# Altium PCB K601-6252双模带屏 VER 1.1 2026 10 16.PcbDoc (part 10 of 12)
Units mm, origin at the board's own origin, x right, y up, seen from the top; angles counter-clockwise.
Board outline 75.02 x 25.73 mm, 2 copper layers (Top Layer, Bottom Layer); 43 components, 67 nets, 219 pads, 157 vias.
Unrouted connection lines stored in the file: 1.
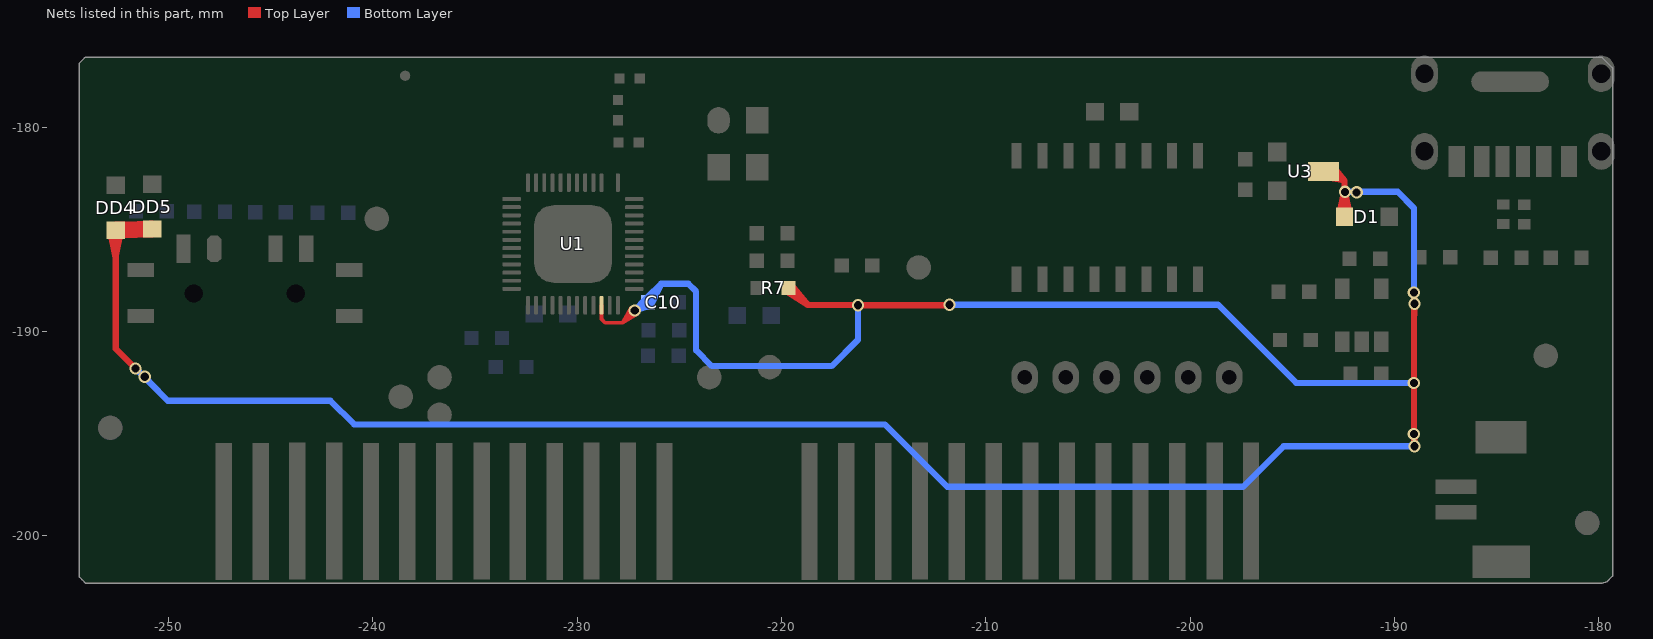
[diagram p10: the nets of this part, all layers, seen from the top]

## Via types
v1: diameter 0.6, hole 0.4, Top Layer to Bottom Layer, tented both sides, 154 vias
v2: diameter 0.6, hole 0.4, Top Layer to Bottom Layer, 3 vias

## Nets (pads, with @x,y where several pads share a name; then routed paths per layer and width w, separated by ;. In a path a pad name is that pad's centre, name@x,y a point inside that pad or via, vN(x,y) a via of type N, cw(c..) or ccw(c..) an arc to the next point about the centre after c; other vN are vias at no path point) (continued)
VABT: C10.1 D1.2 DD4.1 DD5.1 R7.2 U1.34 U3.3 | length 704.6
  Top Layer w0.18: U1.34@-228.8,-188.723 -228.8,-189.398 ; -228.8,-189.398 -228.625,-189.573 -227.775,-189.573 ; -228.8,-189.398 U1.34@-228.8,-189.078 ; -228.8,-189.398 U1.34@-228.8,-189.078 ; -228.8,-189.398 U1.34@-228.8,-189.078 ; -227.775,-189.573 v1(-227.175,-188.973) ; -227.775,-189.573 v1@-227.046,-189.138 ; -227.775,-189.573 v1@-227.341,-188.844 ; -227.775,-189.573 v1(-227.175,-188.973) ; -227.775,-189.573 v1@-227.046,-189.138 ; -227.775,-189.573 v1@-227.341,-188.844 ; -227.775,-189.573 v1(-227.175,-188.973) ; -227.775,-189.573 v1@-227.046,-189.138 ; -227.775,-189.573 v1@-227.341,-188.844 ; -227.775,-189.573 v1(-227.175,-188.973) ; -227.775,-189.573 v1@-227.046,-189.138 ; -227.775,-189.573 v1@-227.341,-188.844 ; -227.775,-189.573 v1(-227.175,-188.973) ; -227.775,-189.573 v1@-227.046,-189.138 ; -227.775,-189.573 v1@-227.341,-188.844 ; -227.775,-189.573 v1(-227.175,-188.973)
  Top Layer w0.305: DD4.1@-252.577,-184.777 DD5.1@-251.122,-184.751 ; DD4.1@-252.569,-184.776 DD5.1@-251.209,-184.804 ; DD4.1@-252.568,-184.776 DD5.1@-251.185,-184.808 ; DD4.1@-252.566,-184.776 DD5.1@-251.068,-184.809 ; DD4.1@-252.562,-185.315 DD5.1@-251.123,-185.257 ; DD4.1@-252.551,-185.315 DD5.1@-251.043,-185.2 ; DD4.1@-252.538,-184.775 DD5.1@-251.06,-184.965 ; DD4.1@-252.528,-184.776 DD5.1@-251.211,-185.006 ; DD4.1@-252.523,-184.776 DD5.1@-251.074,-185.042 ; DD4.1@-252.522,-185.314 DD5.1@-251.074,-185.042 ; DD4.1@-252.512,-185.313 DD5.1@-251.211,-185.006 ; DD4.1@-252.511,-185.313 DD5.1@-251.185,-184.995 ; DD4.1@-252.509,-185.312 DD5.1@-251.06,-184.965 ; DD4.1@-252.496,-184.78 DD5.1@-251.043,-185.2 ; DD4.1@-252.493,-184.781 DD5.1@-251.139,-185.2 ; DD4.1@-252.491,-184.781 DD5.1@-251.17,-185.203 ; DD4.1@-252.483,-184.783 DD5.1@-251.123,-185.257 ; DD4.1@-252.481,-185.307 DD5.1@-251.068,-184.809 ; DD4.1@-252.475,-185.305 DD5.1@-251.185,-184.808 ; DD4.1@-252.474,-185.305 DD5.1@-251.209,-184.804 ; DD4.1@-252.469,-185.303 DD5.1@-251.122,-184.751 ; DD5.1@-250.884,-184.738 DD4.1@-252.174,-185.286 ; DD5.1@-250.883,-184.737 DD4.1@-252.244,-185.302 ; DD5.1@-250.878,-184.736 DD4.1@-252.125,-185.239 ; DD5.1@-250.869,-185.257 DD4.1@-252.187,-184.784 ; DD5.1@-250.868,-185.257 DD4.1@-252.252,-184.771 ; DD5.1@-250.868,-184.733 DD4.1@-252.284,-185.228 ; DD5.1@-250.867,-185.257 DD4.1@-252.237,-184.783 ; DD5.1@-250.866,-185.258 DD4.1@-252.26,-184.782 ; DD5.1@-250.863,-185.258 DD4.1@-252.133,-184.827 ; DD5.1@-250.859,-185.259 DD4.1@-252.153,-184.844 ; DD5.1@-250.859,-185.259 DD4.1@-252.179,-184.837 ; DD5.1@-250.853,-185.26 DD4.1@-252.301,-184.846 ; DD5.1@-250.844,-184.728 DD4.1@-252.216,-185.079 ; DD5.1@-250.842,-184.728 DD4.1@-252.28,-185.076 ; DD5.1@-250.84,-184.728 DD4.1@-252.143,-185.044 ; DD5.1@-250.837,-184.727 DD4.1@-252.139,-185.033 ; DD5.1@-250.835,-184.727 DD4.1@-252.143,-185.023 ; DD5.1@-250.829,-185.264 DD4.1@-252.221,-184.993 ; DD5.1@-250.828,-185.264 DD4.1@-252.288,-184.992 ; DD5.1@-250.828,-184.726 DD4.1@-252.221,-184.993 ; DD5.1@-250.826,-184.726 DD4.1@-252.288,-184.992 ; DD5.1@-250.824,-185.264 DD4.1@-252.143,-185.023 ; DD5.1@-250.82,-185.265 DD4.1@-252.143,-185.044 ; DD5.1@-250.811,-185.265 DD4.1@-252.293,-185.083 ; DD5.1@-250.802,-184.725 DD4.1@-252.227,-184.858 ; DD5.1@-250.796,-184.725 DD4.1@-252.133,-184.827 ; DD5.1@-250.786,-185.265 DD4.1@-252.224,-185.216 ; DD5.1@-250.785,-185.265 DD4.1@-252.284,-185.228 ; DD5.1@-250.786,-184.726 DD4.1@-252.252,-184.771 ; DD5.1@-250.78,-185.264 DD4.1@-252.125,-185.239 ; DD5.1@-250.775,-184.995 -252.525,-184.995 DD4.1@-252.575,-185.045 ; DD5.1@-250.771,-185.263 DD4.1@-252.244,-185.302 ; R7.2@-219.7,-187.708 -218.692,-188.715 ; v1@-211.725,-188.723 v1(-216.25,-188.723) ; U3.3@-193.48,-182.173 -192.894,-182.173 -192.448,-182.619 ; D1.2@-192.448,-184.398 -192.448,-182.619 ; DD4.1@-252.844,-185.072 -252.575,-186.382 ; DD4.1@-252.844,-185.072 -252.575,-186.382 ; DD4.1@-252.844,-185.072 -252.575,-186.382 ; DD4.1@-252.844,-185.072 -252.575,-186.382 ; -252.575,-186.382 DD4.1@-252.306,-185.072 ; -252.575,-186.382 DD4.1@-252.306,-185.072 ; -252.575,-186.382 DD4.1@-252.306,-185.072 ; -252.575,-186.382 DD4.1@-252.575,-185.045 ; -252.575,-186.382 DD4.1@-252.306,-185.072 ; -252.575,-186.382 DD4.1@-252.575,-185.045 ; DD4.1@-252.575,-185.045 -252.575,-190.847 v1(-251.6,-191.822) ; DD4.1@-252.548,-185.045 DD5.1@-251.209,-184.995 ; DD4.1@-252.548,-185.045 DD5.1@-251.209,-184.995 ; DD4.1@-252.548,-185.045 DD5.1@-251.211,-184.995 ; DD4.1@-252.548,-185.045 DD5.1@-251.209,-184.995 ; DD4.1@-252.548,-185.045 DD5.1@-251.209,-184.995 ; DD4.1@-252.548,-185.045 DD5.1@-251.122,-184.751 ; DD4.1@-252.548,-185.045 DD5.1@-251.06,-184.965 ; DD4.1@-252.548,-185.045 DD5.1@-251.185,-184.808 ; DD4.1@-252.548,-185.045 DD5.1@-251.211,-185.006 ; DD4.1@-252.548,-185.045 DD5.1@-251.209,-184.804 ; DD4.1@-252.548,-185.045 DD5.1@-251.185,-184.995 ; DD4.1@-252.548,-185.045 DD5.1@-251.043,-185.2 ; DD4.1@-252.548,-185.045 DD5.1@-251.17,-185.203 ; DD4.1@-252.548,-185.045 DD5.1@-251.123,-185.257 ; DD4.1@-252.548,-185.045 DD5.1@-251.068,-184.809 ; DD4.1@-252.548,-185.045 DD5.1@-251.074,-185.042 ; DD4.1@-252.548,-185.045 DD5.1@-251.139,-185.2 ; -252.547,-190.875 v1(-251.6,-191.822) ; -252.547,-190.875 v1(-251.6,-191.822) ; -252.547,-190.875 v1(-251.6,-191.822) ; DD4.1@-252.53,-184.776 DD5.1@-251.209,-184.995 ; DD4.1@-252.53,-184.776 DD5.1@-251.209,-184.995 ; DD4.1@-252.53,-184.776 DD5.1@-251.211,-184.995 ; DD4.1@-252.53,-184.776 DD5.1@-251.209,-184.995 ; DD4.1@-252.53,-184.776 DD5.1@-251.209,-184.995 ; DD4.1@-252.531,-184.776 DD5.1@-251.185,-184.995 ; DD4.1@-252.51,-185.313 DD5.1@-251.209,-184.995 ; DD4.1@-252.51,-185.313 DD5.1@-251.209,-184.995 ; DD4.1@-252.51,-185.313 DD5.1@-251.211,-184.995 ; DD4.1@-252.51,-185.313 DD5.1@-251.209,-184.995 ; DD4.1@-252.51,-185.313 DD5.1@-251.209,-184.995 ; DD4.1@-252.314,-185.242 DD5.1@-250.783,-185.264 ; DD4.1@-252.314,-185.242 DD5.1@-250.869,-184.733 ; DD4.1@-252.314,-185.242 DD5.1@-250.803,-184.995 ; DD4.1@-252.31,-185.002 -250.825,-185.264 DD4.1@-252.286,-185 ; DD4.1@-252.31,-185.002 -250.828,-184.726 DD4.1@-252.286,-185 ; DD4.1@-252.31,-185.002 DD5.1@-250.803,-184.995 ; DD4.1@-252.301,-184.846 -250.8,-184.725 DD4.1@-252.275,-184.848 ; DD4.1@-252.301,-184.846 DD5.1@-250.803,-184.995 ; DD4.1@-252.298,-184.843 DD5.1@-250.854,-185.26 ; DD4.1@-252.298,-184.843 -250.799,-184.725 DD4.1@-252.153,-184.844 ; DD4.1@-252.298,-184.843 DD5.1@-250.803,-184.995 ; DD4.1@-252.293,-185.083 -250.843,-184.728 DD4.1@-252.257,-185.077 ; DD4.1@-252.293,-185.083 DD5.1@-250.803,-184.995 ; DD4.1@-252.292,-185.235 DD5.1@-250.784,-185.265 ; DD4.1@-252.292,-185.235 DD5.1@-250.869,-184.733 ; DD4.1@-252.292,-185.235 DD5.1@-250.803,-184.995 ; DD4.1@-252.288,-184.992 DD5.1@-250.803,-184.995 ; DD4.1@-252.286,-185 DD5.1@-250.803,-184.995 ; DD4.1@-252.284,-185.228 DD5.1@-250.803,-184.995 ; DD4.1@-252.28,-185.076 DD5.1@-250.813,-185.265 ; DD4.1@-252.28,-185.076 DD5.1@-250.803,-184.995 ; DD4.1@-252.275,-184.848 DD5.1@-250.854,-185.26 ; DD4.1@-252.275,-184.848 DD5.1@-250.803,-184.995 ; DD4.1@-252.26,-184.782 DD5.1@-250.788,-184.725 ; DD4.1@-252.26,-184.782 DD5.1@-250.803,-184.995 ; DD4.1@-252.257,-185.077 DD5.1@-250.812,-185.265 ; DD4.1@-252.257,-185.077 DD5.1@-250.803,-184.995 ; DD4.1@-252.252,-184.771 DD5.1@-250.803,-184.995 ; DD4.1@-252.244,-185.302 DD5.1@-250.803,-184.995 ; DD4.1@-252.237,-184.783 DD5.1@-250.788,-184.725 ; DD4.1@-252.237,-184.783 DD5.1@-250.803,-184.995 ; DD4.1@-252.227,-184.858 DD5.1@-250.854,-185.26 ; DD4.1@-252.227,-184.858 DD5.1@-250.803,-184.995 ; DD4.1@-252.224,-185.216 DD5.1@-250.869,-184.733 ; DD4.1@-252.224,-185.216 DD5.1@-250.803,-184.995 ; DD4.1@-252.221,-184.993 DD5.1@-250.803,-184.995 ; DD4.1@-252.219,-185.288 DD5.1@-250.773,-185.264 ; DD4.1@-252.219,-185.288 -250.882,-184.737 DD4.1@-252.201,-185.287 ; DD4.1@-252.219,-185.288 DD5.1@-250.803,-184.995 ; DD4.1@-252.216,-185.079 DD5.1@-250.812,-185.265 ; DD4.1@-252.216,-185.079 DD5.1@-250.803,-184.995 ; DD4.1@-252.201,-185.287 DD5.1@-250.773,-185.264 ; DD4.1@-252.201,-185.287 DD5.1@-250.803,-184.995 ; DD4.1@-252.187,-184.784 DD5.1@-250.788,-184.725 ; DD4.1@-252.187,-184.784 DD5.1@-250.803,-184.995 ; DD4.1@-252.181,-185.232 DD5.1@-250.783,-185.264 ; DD4.1@-252.181,-185.232 DD5.1@-250.874,-184.735 ; DD4.1@-252.181,-185.232 DD5.1@-250.803,-184.995 ; DD4.1@-252.179,-185.232 DD5.1@-250.783,-185.264 ; DD4.1@-252.179,-185.232 DD5.1@-250.874,-184.735 ; DD4.1@-252.179,-185.232 DD5.1@-250.803,-184.995 ; DD4.1@-252.179,-185.232 DD5.1@-250.783,-185.264 ; DD4.1@-252.179,-185.232 DD5.1@-250.874,-184.735 ; DD4.1@-252.179,-185.232 DD5.1@-250.803,-184.995 ; DD4.1@-252.179,-185.232 DD5.1@-250.783,-185.264 ; DD4.1@-252.179,-185.232 DD5.1@-250.874,-184.735 ; DD4.1@-252.179,-185.232 DD5.1@-250.803,-184.995 ; DD4.1@-252.179,-185.232 DD5.1@-250.783,-185.264 ; DD4.1@-252.179,-185.232 DD5.1@-250.874,-184.735 ; DD4.1@-252.179,-185.232 DD5.1@-250.803,-184.995 ; DD4.1@-252.179,-185.232 DD5.1@-250.783,-185.264 ; DD4.1@-252.179,-185.232 DD5.1@-250.874,-184.735 ; DD4.1@-252.179,-185.232 DD5.1@-250.803,-184.995 ; DD4.1@-252.179,-185.232 DD5.1@-250.783,-185.264 ; DD4.1@-252.179,-185.232 DD5.1@-250.874,-184.735 ; DD4.1@-252.179,-185.232 DD5.1@-250.803,-184.995 ; DD4.1@-252.179,-185.232 DD5.1@-250.783,-185.264 ; DD4.1@-252.179,-185.232 DD5.1@-250.874,-184.735 ; DD4.1@-252.179,-185.232 DD5.1@-250.803,-184.995 ; DD4.1@-252.179,-184.837 DD5.1@-250.798,-184.725 ; DD4.1@-252.179,-184.837 DD5.1@-250.803,-184.995 ; DD4.1@-252.174,-185.286 DD5.1@-250.772,-185.264 ; DD4.1@-252.174,-185.286 DD5.1@-250.803,-184.995 ; DD4.1@-252.172,-185.233 DD5.1@-250.782,-185.264 ; DD4.1@-252.172,-185.233 DD5.1@-250.874,-184.735 ; DD4.1@-252.172,-185.233 DD5.1@-250.803,-184.995 ; DD4.1@-252.171,-184.835 DD5.1@-250.86,-185.259 ; DD4.1@-252.171,-184.835 DD5.1@-250.798,-184.725 ; DD4.1@-252.171,-184.835 DD5.1@-250.803,-184.995 ; DD4.1@-252.169,-184.836 DD5.1@-250.86,-185.259 ; DD4.1@-252.169,-184.836 DD5.1@-250.798,-184.725 ; DD4.1@-252.169,-184.836 DD5.1@-250.803,-184.995 ; DD4.1@-252.169,-184.836 DD5.1@-250.86,-185.259 ; DD4.1@-252.169,-184.836 DD5.1@-250.798,-184.725 ; DD4.1@-252.169,-184.836 DD5.1@-250.803,-184.995 ; DD4.1@-252.169,-184.836 DD5.1@-250.86,-185.259 ; DD4.1@-252.169,-184.836 DD5.1@-250.798,-184.725 ; DD4.1@-252.169,-184.836 DD5.1@-250.803,-184.995 ; DD4.1@-252.169,-184.836 DD5.1@-250.86,-185.259 ; DD4.1@-252.169,-184.836 DD5.1@-250.798,-184.725 ; DD4.1@-252.169,-184.836 DD5.1@-250.803,-184.995 ; DD4.1@-252.169,-184.836 DD5.1@-250.86,-185.259 ; DD4.1@-252.169,-184.836 DD5.1@-250.798,-184.725 ; DD4.1@-252.169,-184.836 DD5.1@-250.803,-184.995 ; DD4.1@-252.169,-184.836 DD5.1@-250.86,-185.259 ; DD4.1@-252.169,-184.836 DD5.1@-250.798,-184.725 ; DD4.1@-252.169,-184.836 DD5.1@-250.803,-184.995 ; DD4.1@-252.169,-184.836 DD5.1@-250.86,-185.259 ; DD4.1@-252.169,-184.836 DD5.1@-250.798,-184.725 ; DD4.1@-252.169,-184.836 DD5.1@-250.803,-184.995 ; DD4.1@-252.163,-185.229 DD5.1@-250.783,-185.265 ; DD4.1@-252.163,-185.229 DD5.1@-250.874,-184.735 ; DD4.1@-252.163,-185.229 DD5.1@-250.803,-184.995 ; DD4.1@-252.156,-184.837 DD5.1@-250.86,-185.259 ; DD4.1@-252.156,-184.837 DD5.1@-250.798,-184.725 ; DD4.1@-252.156,-184.837 DD5.1@-250.803,-184.995 ; DD4.1@-252.153,-184.844 DD5.1@-250.803,-184.995 ; DD4.1@-252.144,-185.03 DD5.1@-250.823,-185.264 ; DD4.1@-252.144,-185.03 DD5.1@-250.837,-184.727 ; DD4.1@-252.144,-185.03 DD5.1@-250.803,-184.995 ; DD4.1@-252.143,-185.225 DD5.1@-250.784,-185.265 ; DD4.1@-252.143,-185.225 DD5.1@-250.874,-184.735 ; DD4.1@-252.143,-185.225 DD5.1@-250.803,-184.995 ; DD4.1@-252.143,-185.044 DD5.1@-250.803,-184.995 ; DD4.1@-252.143,-185.03 DD5.1@-250.823,-185.264 ; DD4.1@-252.143,-185.03 DD5.1@-250.837,-184.727 ; DD4.1@-252.143,-185.03 DD5.1@-250.803,-184.995 ; DD4.1@-252.143,-185.03 DD5.1@-250.823,-185.264 ; DD4.1@-252.143,-185.03 DD5.1@-250.837,-184.727 ; DD4.1@-252.143,-185.03 DD5.1@-250.803,-184.995 ; DD4.1@-252.143,-185.03 DD5.1@-250.823,-185.264 ; DD4.1@-252.143,-185.03 DD5.1@-250.837,-184.727 ; DD4.1@-252.143,-185.03 DD5.1@-250.803,-184.995 ; DD4.1@-252.143,-185.03 DD5.1@-250.823,-185.264 ; DD4.1@-252.143,-185.03 DD5.1@-250.837,-184.727 ; DD4.1@-252.143,-185.03 DD5.1@-250.803,-184.995 ; DD4.1@-252.143,-185.03 DD5.1@-250.823,-185.264 ; DD4.1@-252.143,-185.03 DD5.1@-250.837,-184.727 ; DD4.1@-252.143,-185.03 DD5.1@-250.803,-184.995 ; DD4.1@-252.143,-185.03 DD5.1@-250.823,-185.264 ; DD4.1@-252.143,-185.03 DD5.1@-250.837,-184.727 ; DD4.1@-252.143,-185.03 DD5.1@-250.803,-184.995 ; DD4.1@-252.143,-185.03 DD5.1@-250.823,-185.264 ; DD4.1@-252.143,-185.03 DD5.1@-250.837,-184.727 ; DD4.1@-252.143,-185.03 DD5.1@-250.803,-184.995 ; DD4.1@-252.143,-185.023 DD5.1@-250.803,-184.995 ; DD4.1@-252.141,-185.03 DD5.1@-250.823,-185.264 ; DD4.1@-252.141,-185.03 DD5.1@-250.837,-184.727 ; DD4.1@-252.141,-185.03 DD5.1@-250.803,-184.995 ; DD4.1@-252.139,-185.033 DD5.1@-250.822,-185.265 ; DD4.1@-252.139,-185.033 DD5.1@-250.803,-184.995 ; DD4.1@-252.139,-185.03 DD5.1@-250.823,-185.264 ; DD4.1@-252.139,-185.03 DD5.1@-250.837,-184.727 ; DD4.1@-252.139,-185.03 DD5.1@-250.803,-184.995 ; DD4.1@-252.139,-184.995 DD5.1@-250.83,-185.264 ; DD4.1@-252.139,-184.995 DD5.1@-250.83,-184.726 ; DD4.1@-252.139,-184.995 DD5.1@-250.803,-184.995 ; DD4.1@-252.139,-184.995 DD5.1@-250.83,-185.264 ; DD4.1@-252.139,-184.995 DD5.1@-250.83,-184.726 ; DD4.1@-252.139,-184.995 DD5.1@-250.803,-184.995 ; DD4.1@-252.139,-184.995 DD5.1@-250.83,-185.264 ; DD4.1@-252.139,-184.995 DD5.1@-250.83,-184.726 ; DD4.1@-252.139,-184.995 DD5.1@-250.803,-184.995 ; DD4.1@-252.139,-184.995 DD5.1@-250.83,-185.264 ; DD4.1@-252.139,-184.995 DD5.1@-250.83,-184.726 ; DD4.1@-252.139,-184.995 DD5.1@-250.803,-184.995 ; DD4.1@-252.139,-184.995 DD5.1@-250.83,-185.264 ; DD4.1@-252.139,-184.995 DD5.1@-250.83,-184.726 ; DD4.1@-252.139,-184.995 DD5.1@-250.803,-184.995 ; DD4.1@-252.134,-184.84 DD5.1@-250.861,-185.259 ; DD4.1@-252.134,-184.84 DD5.1@-250.798,-184.725 ; DD4.1@-252.134,-184.84 DD5.1@-250.803,-184.995 ; DD4.1@-252.133,-184.827 DD5.1@-250.803,-184.995 ; DD4.1@-252.127,-185.223 DD5.1@-250.784,-185.265 ; DD4.1@-252.127,-185.223 DD5.1@-250.875,-184.735 ; DD4.1@-252.127,-185.223 DD5.1@-250.803,-184.995 ; DD4.1@-252.125,-185.239 DD5.1@-250.803,-184.995 ; DD5.1@-251.17,-185.203 -252.552,-185.315 DD5.1@-251.139,-185.2 ; R7.2@-219.769,-188.031 -218.692,-188.715 ; R7.2@-219.769,-188.031 -218.692,-188.715 ; R7.2@-219.769,-188.031 -218.692,-188.715 ; R7.2@-219.769,-188.031 -218.692,-188.715 ; R7.2@-219.769,-188.031 -218.692,-188.715 ; R7.2@-219.65,-187.873 -218.692,-188.715 ; R7.2@-219.65,-187.873 -218.692,-188.715 ; R7.2@-219.65,-187.873 -218.692,-188.715 ; R7.2@-219.65,-187.873 -218.692,-188.715 ; R7.2@-219.508,-187.735 -218.692,-188.715 ; R7.2@-219.508,-187.735 -218.692,-188.715 ; R7.2@-219.508,-187.735 -218.692,-188.715 ; R7.2@-219.508,-187.735 -218.692,-188.715 ; R7.2@-219.508,-187.735 -218.692,-188.715 ; -218.692,-188.715 -216.257,-188.715 v1(-216.25,-188.723) ; -217.465,-188.715 v1(-216.25,-188.723) ; -217.465,-188.715 v1(-216.25,-188.723) ; -217.464,-188.715 v1(-216.25,-188.723) ; U3.3@-193.286,-182.457 -192.448,-182.619 ; U3.3@-193.286,-182.457 -192.448,-182.619 ; U3.3@-193.286,-182.457 -192.448,-182.619 ; U3.3@-193.286,-182.457 -192.448,-182.619 ; U3.3@-193.286,-182.457 -192.448,-182.619 ; U3.3@-193.175,-182.173 -192.448,-182.619 ; U3.3@-193.175,-182.173 -192.448,-182.619 ; U3.3@-193.175,-182.173 -192.448,-182.619 ; U3.3@-193.175,-182.173 -192.448,-182.619 ; U3.3@-193.175,-182.173 -192.448,-182.619 ; U3.3@-192.972,-181.945 -192.448,-182.619 ; U3.3@-192.972,-181.945 -192.448,-182.619 ; U3.3@-192.972,-181.945 -192.448,-182.619 ; U3.3@-192.972,-181.945 -192.448,-182.619 ; U3.3@-192.972,-181.945 -192.448,-182.619 ; D1.2@-192.716,-184.343 v1@-192.448,-183.033 ; D1.2@-192.716,-184.343 v1(-192.423,-183.173) ; D1.2@-192.716,-184.343 v1@-192.448,-183.033 ; D1.2@-192.716,-184.343 v1@-192.448,-183.033 ; D1.2@-192.716,-184.343 v1@-192.448,-183.033 ; D1.2@-192.716,-184.343 v1@-192.448,-183.033 ; D1.2@-192.716,-184.343 v1(-192.423,-183.173) ; D1.2@-192.716,-184.343 v1(-192.423,-183.173) ; D1.2@-192.716,-184.343 v1(-192.423,-183.173) ; D1.2@-192.716,-184.343 v1(-192.423,-183.173) ; D1.2@-192.716,-184.343 v1(-192.423,-183.173) ; D1.2@-192.715,-184.334 v1(-192.423,-183.173) ; D1.2@-192.715,-184.334 v1(-192.423,-183.173) ; D1.2@-192.715,-184.334 v1(-192.423,-183.173) ; D1.2@-192.715,-184.334 v1(-192.423,-183.173) ; D1.2@-192.448,-184.37 v1@-192.448,-183.033 ; D1.2@-192.448,-184.37 v1(-192.423,-183.173) ; D1.2@-192.448,-184.37 v1@-192.448,-183.033 ; D1.2@-192.448,-184.37 v1@-192.448,-183.033 ; D1.2@-192.448,-184.37 v1@-192.448,-183.033 ; D1.2@-192.448,-184.37 v1@-192.448,-183.033 ; D1.2@-192.448,-184.37 v1(-192.423,-183.173) ; D1.2@-192.448,-184.37 v1(-192.423,-183.173) ; D1.2@-192.448,-184.37 v1(-192.423,-183.173) ; D1.2@-192.448,-184.37 v1(-192.423,-183.173) ; D1.2@-192.448,-184.37 v1(-192.423,-183.173) ; D1.2@-192.448,-184.37 v1(-192.423,-183.173) ; D1.2@-192.448,-184.37 v1(-192.423,-183.173) ; D1.2@-192.448,-184.37 v1(-192.423,-183.173) ; D1.2@-192.448,-184.37 v1(-192.423,-183.173) ; v1@-192.448,-183.033 D1.2@-192.179,-184.343 ; v1@-192.448,-183.033 D1.2@-192.179,-184.343 ; v1@-192.448,-183.033 D1.2@-192.179,-184.343 ; v1@-192.448,-183.033 D1.2@-192.179,-184.343 ; v1@-192.448,-183.033 D1.2@-192.179,-184.343 ; -192.448,-182.619 v1(-192.423,-183.173) ; -192.448,-182.619 v1(-192.423,-183.173) ; v1(-192.423,-183.173) -192.448,-184.388 v1(-192.423,-183.173) ; v1(-192.423,-183.173) D1.2@-192.179,-184.343 ; v1(-192.423,-183.173) D1.2@-192.179,-184.345 ; v1(-192.423,-183.173) D1.2@-192.179,-184.345 ; v1(-192.423,-183.173) D1.2@-192.179,-184.345 ; v1(-192.423,-183.173) D1.2@-192.179,-184.345 ; v1(-192.423,-183.173) D1.2@-192.179,-184.343 ; v1(-192.423,-183.173) D1.2@-192.179,-184.343 ; v1(-192.423,-183.173) D1.2@-192.179,-184.343 ; v1(-192.423,-183.173) D1.2@-192.179,-184.343 ; v1(-192.423,-183.173) D1.2@-192.179,-184.343 ; v1(-189.05,-195.023) v1(-189.025,-195.623) ; v1(-189.05,-195.023) -189.05,-194.407 ; v1(-189.05,-195.023) v1(-189.025,-195.623) ; v1(-189.05,-195.023) -189.05,-194.407 ; v1(-189.05,-195.023) v1(-189.025,-195.623) ; v1(-189.05,-195.023) -189.05,-194.407 ; -189.05,-194.407 v1(-189.025,-195.623) ; -189.05,-194.407 v1(-189.025,-195.623) ; v1(-189.05,-188.098) v1(-189.05,-192.522) -189.05,-195.598 v1(-189.025,-195.623) ; v1(-189.05,-188.098) v1(-189.025,-188.648) ; v1(-189.05,-188.098) v1(-189.025,-188.648) ; v1(-189.025,-188.648) -189.05,-189.863 v1(-189.025,-188.648) ; -212.99,-188.723 v1(-211.775,-188.698) -212.99,-188.723
  Bottom Layer w0.305: C10.1@-226.683,-188.454 -226.235,-188.022 ; C10.1@-226.338,-188.636 -226.235,-188.022 ; v1@-216.225,-188.698 v1(-216.25,-188.723) -216.25,-190.407 -217.541,-191.698 -223.4,-191.698 -224.175,-190.923 -224.175,-188.048 -224.55,-187.673 -225.886,-187.673 ; v1(-211.775,-188.698) -198.631,-188.698 -194.807,-192.522 v1(-189.05,-192.522) ; v1(-189.05,-188.098) -189.05,-183.963 -189.841,-183.173 v1(-192.423,-183.173) ; v1(-251.6,-191.822) -250.031,-193.391 -242.064,-193.391 -240.9,-194.555 -214.935,-194.555 -211.885,-197.605 -197.409,-197.605 -195.426,-195.623 v1(-189.025,-195.623) ; v1(-251.6,-191.822) v1(-251.15,-192.222) ; v1(-251.6,-191.822) v1(-251.15,-192.222) ; v1(-251.15,-192.222) -250.234,-193.188 v1(-251.15,-192.222) ; v1(-227.175,-188.973) v1@-227.175,-188.962 ; v1(-227.175,-188.973) C10.1@-226.648,-188.418 ; v1(-227.175,-188.973) -226.235,-188.022 ; v1(-227.175,-188.973) C10.1@-226.447,-188.754 ; v1(-227.175,-188.973) C10.1@-226.525,-188.573 ; v1(-227.175,-188.973) C10.1@-226.444,-188.753 ; v1(-227.175,-188.973) C10.1@-226.65,-188.419 ; v1(-227.175,-188.973) C10.1@-226.525,-188.573 ; v1(-227.175,-188.973) C10.1@-226.444,-188.753 ; v1(-227.175,-188.973) C10.1@-226.65,-188.419 ; v1(-227.175,-188.973) C10.1@-226.525,-188.573 ; v1(-227.175,-188.973) C10.1@-226.444,-188.753 ; v1(-227.175,-188.973) C10.1@-226.65,-188.419 ; v1(-227.175,-188.973) C10.1@-226.525,-188.573 ; v1(-227.175,-188.973) C10.1@-226.444,-188.753 ; v1(-227.175,-188.973) C10.1@-226.65,-188.419 ; v1(-227.175,-188.973) C10.1@-226.525,-188.573 ; v1(-227.175,-188.973) C10.1@-226.648,-188.418 ; v1(-227.175,-188.973) C10.1@-226.648,-188.418 ; v1(-227.175,-188.973) C10.1@-226.648,-188.418 ; v1(-227.175,-188.973) C10.1@-226.648,-188.418 ; v1(-227.175,-188.973) C10.1@-226.648,-188.418 ; v1(-227.175,-188.973) -226.235,-188.022 ; v1(-227.175,-188.973) C10.1@-226.447,-188.754 ; v1(-227.175,-188.973) C10.1@-226.525,-188.573 ; v1(-227.175,-188.973) C10.1@-226.447,-188.754 ; v1(-227.175,-188.973) C10.1@-226.525,-188.573 ; v1(-227.175,-188.973) C10.1@-226.447,-188.754 ; v1(-227.175,-188.973) C10.1@-226.525,-188.573 ; v1(-227.175,-188.973) C10.1@-226.447,-188.754 ; v1(-227.175,-188.973) C10.1@-226.525,-188.573 ; v1(-227.175,-188.973) C10.1@-226.447,-188.754 ; v1(-227.175,-188.973) C10.1@-226.525,-188.573 ; v1@-227.175,-188.962 -225.886,-187.673 ; v1@-227.175,-188.962 C10.1@-226.447,-188.754 ; v1@-227.175,-188.962 C10.1@-226.648,-188.418 ; v1@-227.175,-188.962 C10.1@-226.525,-188.573 ; v1@-227.175,-188.962 C10.1@-226.447,-188.754 ; v1@-227.175,-188.962 C10.1@-226.648,-188.418 ; v1@-227.175,-188.962 C10.1@-226.525,-188.573 ; v1@-227.175,-188.962 C10.1@-226.447,-188.754 ; v1@-227.175,-188.962 C10.1@-226.648,-188.418 ; v1@-227.175,-188.962 C10.1@-226.525,-188.573 ; v1@-227.175,-188.962 C10.1@-226.447,-188.754 ; v1@-227.175,-188.962 C10.1@-226.648,-188.418 ; v1@-227.175,-188.962 C10.1@-226.525,-188.573 ; v1@-227.175,-188.962 C10.1@-226.447,-188.754 ; v1@-227.175,-188.962 C10.1@-226.648,-188.418 ; v1@-227.175,-188.962 C10.1@-226.525,-188.573 ; C10.1@-226.675,-188.444 -225.886,-187.673 ; C10.1@-226.675,-188.444 -225.886,-187.673 ; C10.1@-226.675,-188.444 -225.886,-187.673 ; C10.1@-226.675,-188.444 -225.886,-187.673 ; C10.1@-226.675,-188.444 -225.886,-187.673 ; C10.1@-226.525,-188.573 -225.886,-187.673 ; C10.1@-226.525,-188.573 -225.886,-187.673 ; C10.1@-226.525,-188.573 -225.886,-187.673 ; C10.1@-226.525,-188.573 -225.886,-187.673 ; C10.1@-226.525,-188.573 -226.235,-188.022 ; C10.1@-226.354,-188.672 -225.886,-187.673 ; C10.1@-226.354,-188.672 -225.886,-187.673 ; C10.1@-226.354,-188.672 -225.886,-187.673 ; C10.1@-226.354,-188.672 -225.886,-187.673 ; C10.1@-226.354,-188.672 -225.886,-187.673 ; v1(-192.423,-183.173) v1(-191.85,-183.198) ; v1(-192.423,-183.173) v1(-191.85,-183.198) ; v1(-191.85,-183.198) -190.635,-183.173 v1(-191.85,-183.198) ; -190.239,-195.623 v1(-189.025,-195.623) ; -190.239,-195.623 v1(-189.025,-195.623) ; -190.239,-195.623 v1(-189.025,-195.623)